# Altium PCB Thunderscope_Rev5.3.PcbDoc (part 2 of 14)
Units mil, origin at the board's own origin, x right, y up, seen from the top; angles counter-clockwise.
Board outline 3937.01 x 3838.58 mil, 6 copper layers (F.Cu, In1.Cu (GND), In2.Cu (Sign), In3.Cu (Sign), In4.Cu (GND), B.Cu), stack 60.556 mil thick; 911 components, 486 nets, 2834 pads, 2761 vias.
Unrouted connection lines stored in the file: 618.
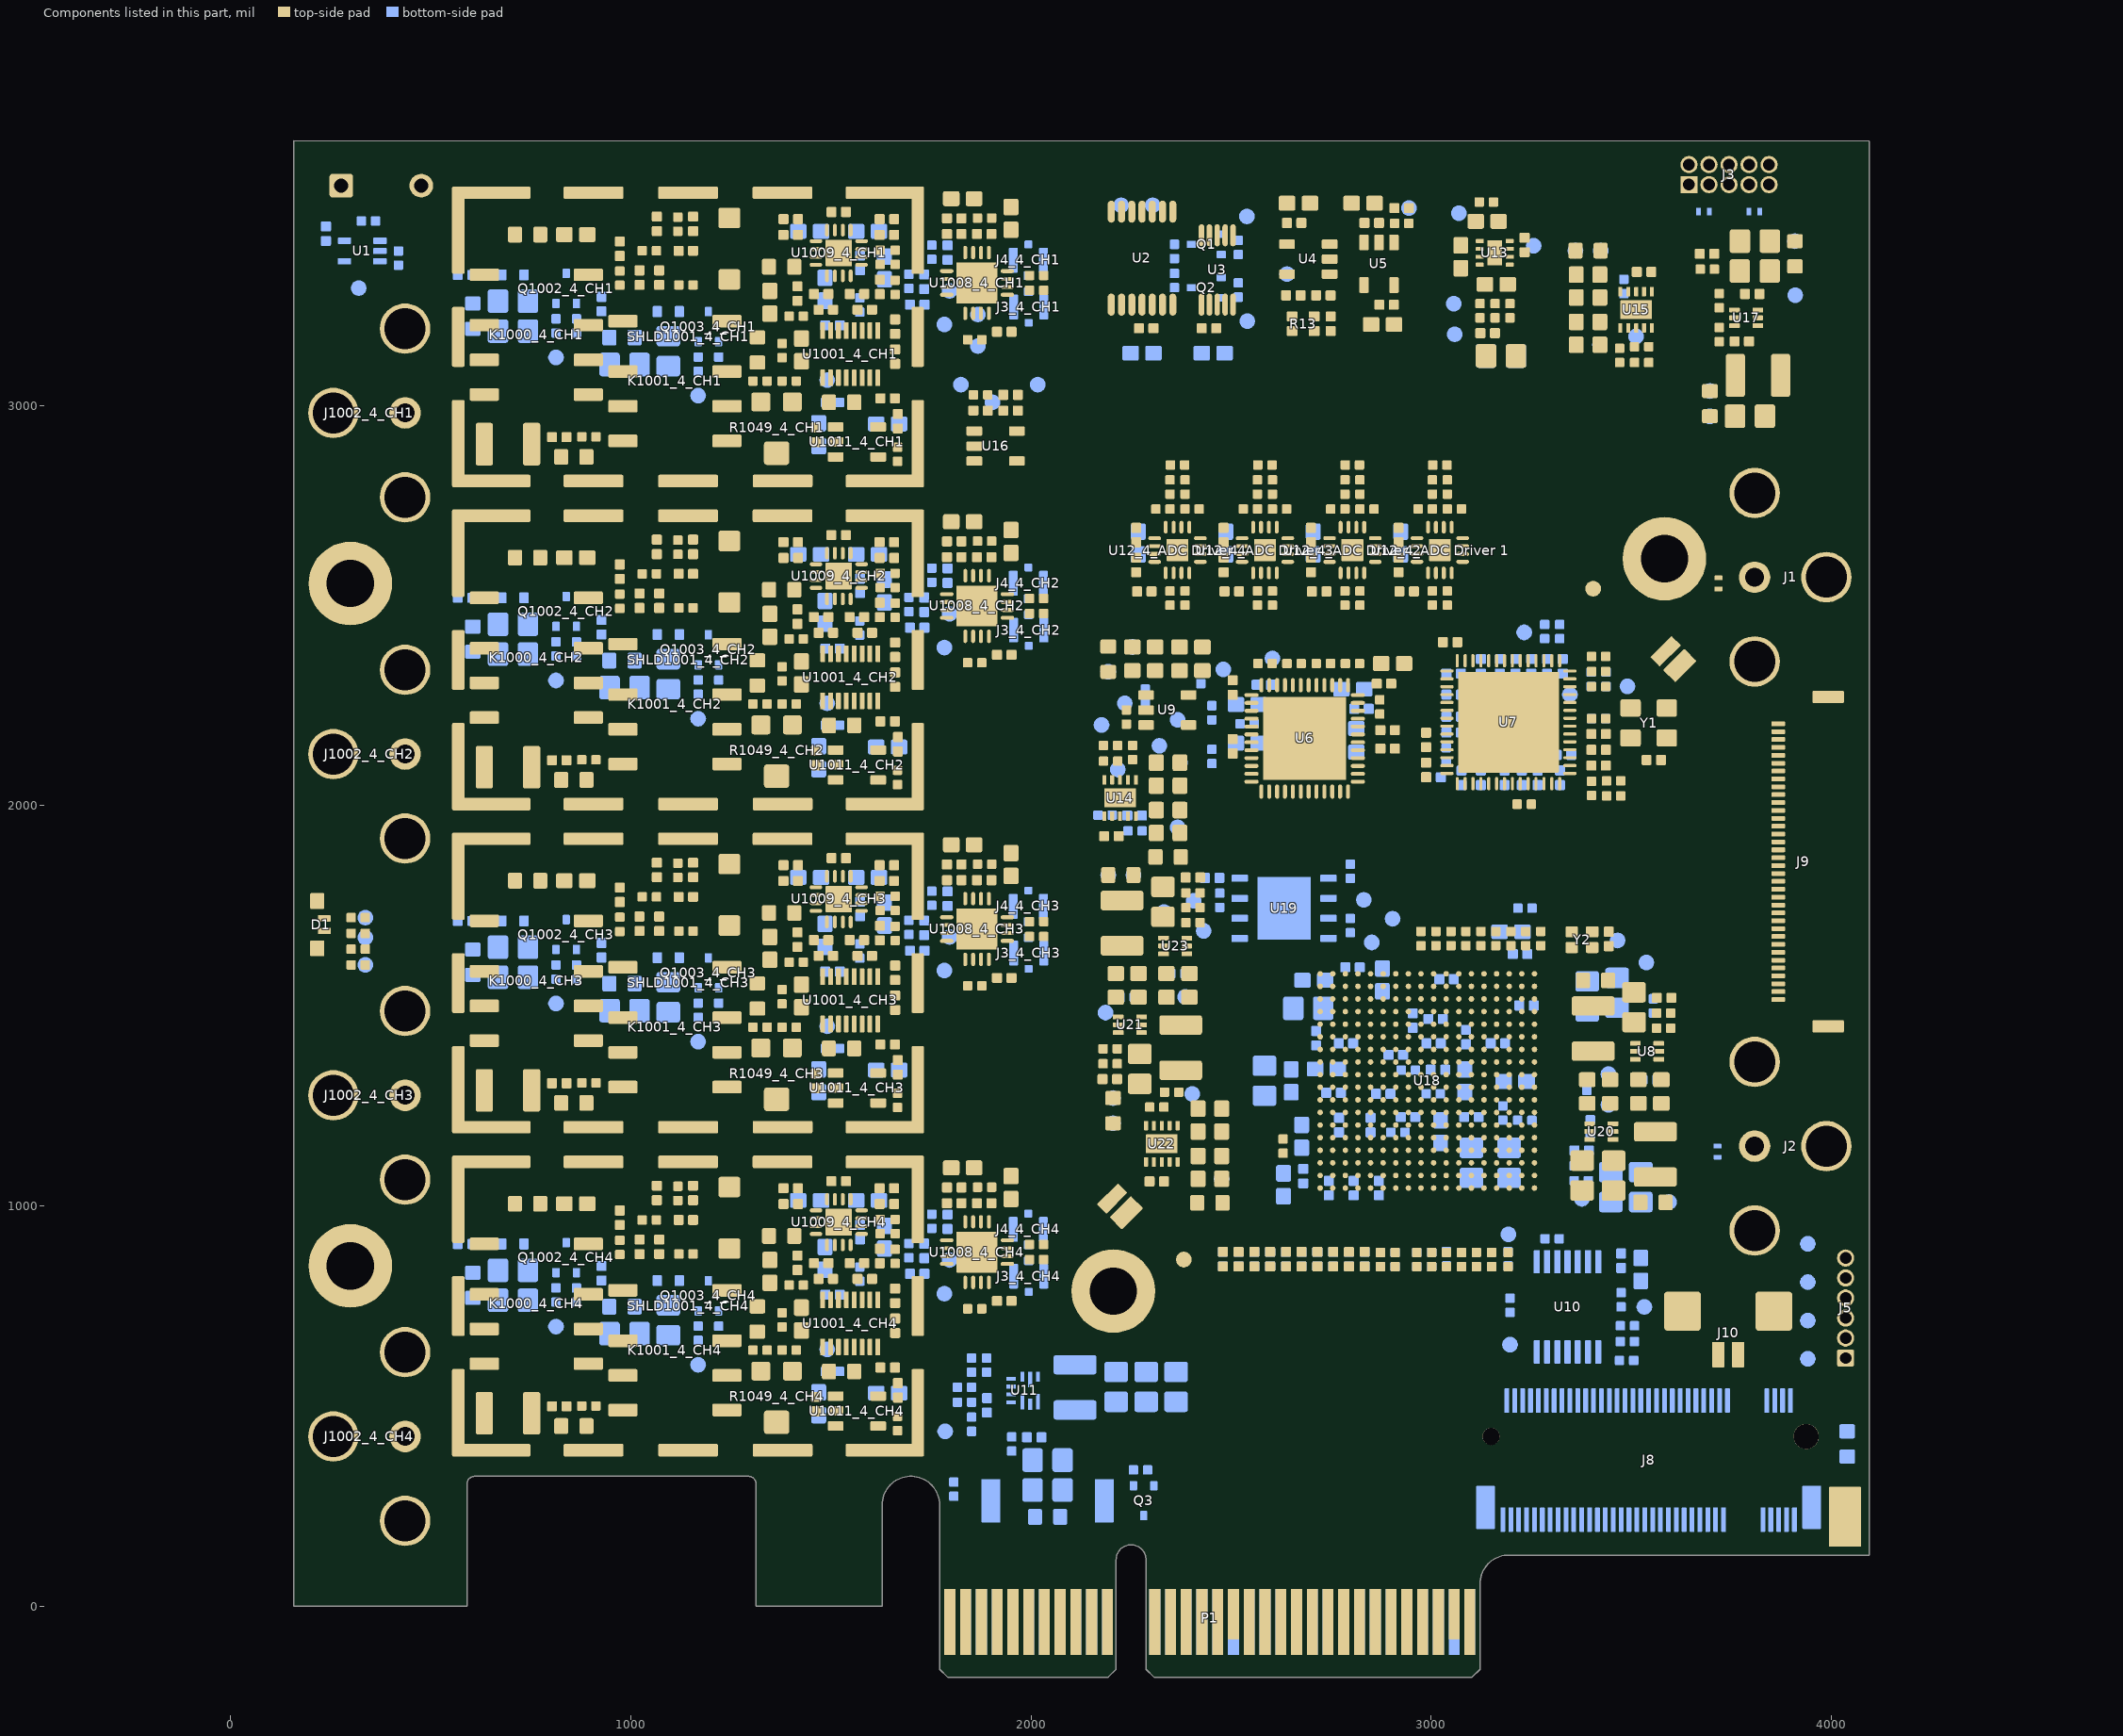
[diagram p6: the components of this part, seen from the top]

## Design rules (kind name [scope] priority, off if disabled: settings) (continued)
SolderMaskExpansion [All] p1: expansion=4 istentingtop=TRUE
ViasUnderSMD [All] p1: allowed=TRUE
Width GND [InNet('GND')] p1: maxlimit=30 minlimit=5 preferedwidth=20
Width Power [InNetClass('Power')] p2: maxlimit=40 minlimit=20 preferedwidth=30
Width 3V3 [InNetClass('3V3')] p3: maxlimit=30 minlimit=10 preferedwidth=20
Width 50Z [InNetClass('50Z')] p4: maxlimit=10 minlimit=5 preferedwidth=6.13 toplayer_minwidth=5.9 toplayer_maxwidth=6.1 toplayer_prefwidth=5.9 midlayer2_minwidth=6.13 midlayer2_maxwidth=6.13 midlayer3_minwidth=6.13 midlayer3_maxwidth=6.13 bottomlayer_minwidth=8.37 bottomlayer_maxwidth=8.37 bottomlayer_prefwidth=8.37 minimp=50.000000 maximp=50.000000 favimp=50.000000
Width [All] p5: maxlimit=400 minlimit=5 preferedwidth=10 midlayer3_prefwidth=8 midlayer4_minwidth=6 midlayer4_prefwidth=8 minimp=50.000000 maximp=50.000000 favimp=50.000000
23 further rules are at their usual default settings.

## Classes and differential pairs
net class 50Z: BNC_IN_CH1 BNC_IN_CH2 BNC_IN_CH3 BNC_IN_CH4
differential pair class USERIO: USERIO.USRIO_1 USERIO.USRIO_2 USERIO.USRIO_3 USERIO.USRIO_4 USERIO.USRIO_5 USERIO.USRIO_6 USERIO.USRIO_7 USERIO.USRIO_8 USERIO.USRIO_9 USERIO.USRIO_10 USERIO.USRIO_11 USERIO.USRIO_12
differential pair class PCIe: M2_PER0 M2_PER1 M2_PER2 M2_PER3 M2_PET0 M2_PET1 M2_PET2 M2_PET3 M2_REFCLK MGT_CLK1 MGT_RX0 MGT_RX1 MGT_RX2 MGT_RX3 MGT_TX0 MGT_TX1 MGT_TX2 MGT_TX3 PCIe_PER0 PCIe_PER1 PCIe_PER2 PCIe_PER3 PCIe_PET0 PCIe_PET1 PCIe_PET2 PCIe_PET3 PCIe_REFCLK
differential pair class 100Z_Diff: D1A D1B D2A D2B D3A D3B D4A D4B FCLK LCLK
differential pair class 100Z_Diff_PGA: CH1 CH2 CH3 CH4
channel class FE_Channel: CH1 CH2 CH3 CH4
channel class ADC_Driver: "ADC Driver 1" "ADC Driver 2" "ADC Driver 3" "ADC Driver 4"
net class TRIM_[4..1]: TRIM_1 TRIM_2 TRIM_3 TRIM_4
net class TERM_[4..1]: TERM_1 TERM_2 TERM_3 TERM_4
net class QSPI_DQ[3..0]: QSPI_DQ0 QSPI_DQ1 QSPI_DQ2 QSPI_DQ3
net class PGA_CSn_[4..1]: PGA_CSn_1 PGA_CSn_2 PGA_CSn_3 PGA_CSn_4
net class DC_CPL_[4..1]: DC_CPL_1 DC_CPL_2 DC_CPL_3 DC_CPL_4
net class ATTEN_[4..1]: ATTEN_1 ATTEN_2 ATTEN_3 ATTEN_4
component class "TS-USB4 Components": C30 C31 C34 C35 C38 C39 C42 C43 C46 C47 C99 C100 C101 C102 C127 C128 D2 D3 J1 J2 J8 J10 L1 R2 R4 R14 R24 R27 R28 R31 R32 R35 R36 R39 R40 R54 R72 R82 R109 R110 SO1 SO2 SO3 SO4 TP21 TP22 U17
component class "TS-PCIe Components": C12 C13 C22 C28 C29 C32 C33 C36 C37 C40 C41 C44 C45 C80 C81 C83 C84 D4 D5 J3 J4 L6 P1 Q3 R3 R5 R7 R23 R25 R26 R29 R30 R33 R34 R37 R38 R41 R42 R71 R73 R74 R81 R87 R88 R92 R95 R108 SHLD1 SYM1 TP14 TP15 TP71 TP72 TP86 U11
component class Thunderscope_Rev5.3: EMI1 EMI2 FID1 FID2 TP2
component class "Front End Trim and Bias": C2 C3 C4 C5 C6 C7 C8 C11 C82 C85 C93 C94 C95 C96 Q1 Q2 R9 R10 R11 R12 R13 R107 TP6 TP7 TP8 TP9 TP59 TP60 U2 U3 U4 U5
component class "FPGA Voltage Regs": C9 C10 C71 C72 C73 C74 C75 C174 C175 C176 C177 C178 C179 C180 C181 C182 C183 C184 C185 C186 C187 C188 L2 L3 L4 L5 R1 R55 R56 R57 R69 R70 R116 R117 R118 R119 R120 R121 R122 R123 R124 R125 R126 R127 R128 R129 R130 TP49 TP50 TP63 TP64 TP65 TP66 TP67 TP68 TP69 TP70 TP79 TP80 TP81 U8 U20 U21 U22 U23
component class FPGA: C1 C78 C79 C130 D1 J5 J9 R6 R8 R60 R61 R62 R63 R64 R65 R85 TP13 TP54 TP55 TP56 TP57 TP58 TP61 U1 U10 Y2
component class "FPGA Power Inputs": C86 C87 C138 C139 C140 C141 C142 C143 C144 C145 C146 C147 C148 C149 C150 C151 C152 C153 C154 C155 C156 C157 C158 C159 C160 C161 C162 C163 C164 C165 C166 C167 C168 C169 C170 C171 C172 C173 C189 C190 C191 FB12 FB13
component class "FPGA IO Banks": R58 R59 R75 R76 R77 R78 R79 R80 R112 TP23 TP24 TP25 TP42 U18
component class "FPGA Config and Transceivers": C129 FB11 R66 R67 R68 R113 R114 R115 TP43 TP44 TP46 TP47 TP48 TP52 TP53 TP75 TP76 TP77 TP78 U19
component class "Clock Generator": C48 C49 C50 C51 C52 C53 C54 C55 C56 C57 C58 C59 C60 C61 C62 C63 C64 C65 C66 C67 C68 C88 C89 C90 C91 C92 FB3 R43 R44 R45 R46 R47 R48 R49 R50 R51 R52 R53 TP16 TP17 TP18 U7 Y1
component class CH4: C1001_4_CH4 C1002_4_CH4 C1003_4_CH4 C1004_4_CH4 C1005_4_CH4 C1006_4_CH4 C1007_4_CH4 C1008_4_CH4 C1009_4_CH4 C1010_4_CH4 C1011_4_CH4 C1012_4_CH4 C1021_4_CH4 C1022_4_CH4 C1023_4_CH4 C1024_4_CH4 C1025_4_CH4 C1026_4_CH4 C1027_4_CH4 C1028_4_CH4 C1029_4_CH4 C1030_4_CH4 C1031_4_CH4 C1032_4_CH4 C1033_4_CH4 C1034_4_CH4 C1035_4_CH4 C1036_4_CH4 C1037_4_CH4 C1038_4_CH4 C1039_4_CH4 C1040_4_CH4 C1041_4_CH4 C1042_4_CH4 C1043_4_CH4 C1044_4_CH4 C1045_4_CH4 C1046_4_CH4 C1047_4_CH4 C1048_4_CH4 C1049_4_CH4 C1050_4_CH4 C1052_4_CH4 C1053_4_CH4 C1054_4_CH4 C1055_4_CH4 C1056_4_CH4 C1057_4_CH4 C1058_4_CH4 C1059_4_CH4 D1000_4_CH4 D1001_4_CH4 FB1000_4_CH4 FB1001_4_CH4 J3_4_CH4 J4_4_CH4 J1002_4_CH4 K1000_4_CH4 K1001_4_CH4 Q1002_4_CH4 Q1003_4_CH4 R52_4_CH4 R97_4_CH4 R1001_4_CH4 R1002_4_CH4 R1003_4_CH4 R1021_4_CH4 R1022_4_CH4 R1024_4_CH4 R1025_4_CH4 R1026_4_CH4 R1027_4_CH4 R1028_4_CH4 R1029_4_CH4 R1030_4_CH4 R1031_4_CH4 R1032_4_CH4 R1033_4_CH4 R1035_4_CH4 R1036_4_CH4 R1037_4_CH4 R1038_4_CH4 R1039_4_CH4 R1041_4_CH4 R1042_4_CH4 R1043_4_CH4 R1044_4_CH4 R1045_4_CH4 R1046_4_CH4 R1047_4_CH4 R1048_4_CH4 R1049_4_CH4 R1052_4_CH4 R1053_4_CH4 SHLD1000_4_CH4 SHLD1001_4_CH4 TP1014_4_CH4 TP1015_4_CH4 TP1016_4_CH4 TP1017_4_CH4 TP1018_4_CH4 U1001_4_CH4 U1008_4_CH4 U1009_4_CH4 U1011_4_CH4
component class CH3: C1001_4_CH3 C1002_4_CH3 C1003_4_CH3 C1004_4_CH3 C1005_4_CH3 C1006_4_CH3 C1007_4_CH3 C1008_4_CH3 C1009_4_CH3 C1010_4_CH3 C1011_4_CH3 C1012_4_CH3 C1021_4_CH3 C1022_4_CH3 C1023_4_CH3 C1024_4_CH3 C1025_4_CH3 C1026_4_CH3 C1027_4_CH3 C1028_4_CH3 C1029_4_CH3 C1030_4_CH3 C1031_4_CH3 C1032_4_CH3 C1033_4_CH3 C1034_4_CH3 C1035_4_CH3 C1036_4_CH3 C1037_4_CH3 C1038_4_CH3 C1039_4_CH3 C1040_4_CH3 C1041_4_CH3 C1042_4_CH3 C1043_4_CH3 C1044_4_CH3 C1045_4_CH3 C1046_4_CH3 C1047_4_CH3 C1048_4_CH3 C1049_4_CH3 C1050_4_CH3 C1052_4_CH3 C1053_4_CH3 C1054_4_CH3 C1055_4_CH3 C1056_4_CH3 C1057_4_CH3 C1058_4_CH3 C1059_4_CH3 D1000_4_CH3 D1001_4_CH3 FB1000_4_CH3 FB1001_4_CH3 J3_4_CH3 J4_4_CH3 J1002_4_CH3 K1000_4_CH3 K1001_4_CH3 Q1002_4_CH3 Q1003_4_CH3 R52_4_CH3 R97_4_CH3 R1001_4_CH3 R1002_4_CH3 R1003_4_CH3 R1021_4_CH3 R1022_4_CH3 R1024_4_CH3 R1025_4_CH3 R1026_4_CH3 R1027_4_CH3 R1028_4_CH3 R1029_4_CH3 R1030_4_CH3 R1031_4_CH3 R1032_4_CH3 R1033_4_CH3 R1035_4_CH3 R1036_4_CH3 R1037_4_CH3 R1038_4_CH3 R1039_4_CH3 R1041_4_CH3 R1042_4_CH3 R1043_4_CH3 R1044_4_CH3 R1045_4_CH3 R1046_4_CH3 R1047_4_CH3 R1048_4_CH3 R1049_4_CH3 R1052_4_CH3 R1053_4_CH3 SHLD1000_4_CH3 SHLD1001_4_CH3 TP1014_4_CH3 TP1015_4_CH3 TP1016_4_CH3 TP1017_4_CH3 TP1018_4_CH3 U1001_4_CH3 U1008_4_CH3 U1009_4_CH3 U1011_4_CH3
component class CH2: C1001_4_CH2 C1002_4_CH2 C1003_4_CH2 C1004_4_CH2 C1005_4_CH2 C1006_4_CH2 C1007_4_CH2 C1008_4_CH2 C1009_4_CH2 C1010_4_CH2 C1011_4_CH2 C1012_4_CH2 C1021_4_CH2 C1022_4_CH2 C1023_4_CH2 C1024_4_CH2 C1025_4_CH2 C1026_4_CH2 C1027_4_CH2 C1028_4_CH2 C1029_4_CH2 C1030_4_CH2 C1031_4_CH2 C1032_4_CH2 C1033_4_CH2 C1034_4_CH2 C1035_4_CH2 C1036_4_CH2 C1037_4_CH2 C1038_4_CH2 C1039_4_CH2 C1040_4_CH2 C1041_4_CH2 C1042_4_CH2 C1043_4_CH2 C1044_4_CH2 C1045_4_CH2 C1046_4_CH2 C1047_4_CH2 C1048_4_CH2 C1049_4_CH2 C1050_4_CH2 C1052_4_CH2 C1053_4_CH2 C1054_4_CH2 C1055_4_CH2 C1056_4_CH2 C1057_4_CH2 C1058_4_CH2 C1059_4_CH2 D1000_4_CH2 D1001_4_CH2 FB1000_4_CH2 FB1001_4_CH2 J3_4_CH2 J4_4_CH2 J1002_4_CH2 K1000_4_CH2 K1001_4_CH2 Q1002_4_CH2 Q1003_4_CH2 R52_4_CH2 R97_4_CH2 R1001_4_CH2 R1002_4_CH2 R1003_4_CH2 R1021_4_CH2 R1022_4_CH2 R1024_4_CH2 R1025_4_CH2 R1026_4_CH2 R1027_4_CH2 R1028_4_CH2 R1029_4_CH2 R1030_4_CH2 R1031_4_CH2 R1032_4_CH2 R1033_4_CH2 R1035_4_CH2 R1036_4_CH2 R1037_4_CH2 R1038_4_CH2 R1039_4_CH2 R1041_4_CH2 R1042_4_CH2 R1043_4_CH2 R1044_4_CH2 R1045_4_CH2 R1046_4_CH2 R1047_4_CH2 R1048_4_CH2 R1049_4_CH2 R1052_4_CH2 R1053_4_CH2 SHLD1000_4_CH2 SHLD1001_4_CH2 TP1014_4_CH2 TP1015_4_CH2 TP1016_4_CH2 TP1017_4_CH2 TP1018_4_CH2 U1001_4_CH2 U1008_4_CH2 U1009_4_CH2 U1011_4_CH2
component class CH1: C1001_4_CH1 C1002_4_CH1 C1003_4_CH1 C1004_4_CH1 C1005_4_CH1 C1006_4_CH1 C1007_4_CH1 C1008_4_CH1 C1009_4_CH1 C1010_4_CH1 C1011_4_CH1 C1012_4_CH1 C1021_4_CH1 C1022_4_CH1 C1023_4_CH1 C1024_4_CH1 C1025_4_CH1 C1026_4_CH1 C1027_4_CH1 C1028_4_CH1 C1029_4_CH1 C1030_4_CH1 C1031_4_CH1 C1032_4_CH1 C1033_4_CH1 C1034_4_CH1 C1035_4_CH1 C1036_4_CH1 C1037_4_CH1 C1038_4_CH1 C1039_4_CH1 C1040_4_CH1 C1041_4_CH1 C1042_4_CH1 C1043_4_CH1 C1044_4_CH1 C1045_4_CH1 C1046_4_CH1 C1047_4_CH1 C1048_4_CH1 C1049_4_CH1 C1050_4_CH1 C1052_4_CH1 C1053_4_CH1 C1054_4_CH1 C1055_4_CH1 C1056_4_CH1 C1057_4_CH1 C1058_4_CH1 C1059_4_CH1 D1000_4_CH1 D1001_4_CH1 FB1000_4_CH1 FB1001_4_CH1 J3_4_CH1 J4_4_CH1 J1002_4_CH1 K1000_4_CH1 K1001_4_CH1 Q1002_4_CH1 Q1003_4_CH1 R52_4_CH1 R97_4_CH1 R1001_4_CH1 R1002_4_CH1 R1003_4_CH1 R1021_4_CH1 R1022_4_CH1 R1024_4_CH1 R1025_4_CH1 R1026_4_CH1 R1027_4_CH1 R1028_4_CH1 R1029_4_CH1 R1030_4_CH1 R1031_4_CH1 R1032_4_CH1 R1033_4_CH1 R1035_4_CH1 R1036_4_CH1 R1037_4_CH1 R1038_4_CH1 R1039_4_CH1 R1041_4_CH1 R1042_4_CH1 R1043_4_CH1 R1044_4_CH1 R1045_4_CH1 R1046_4_CH1 R1047_4_CH1 R1048_4_CH1 R1049_4_CH1 R1052_4_CH1 R1053_4_CH1 SHLD1000_4_CH1 SHLD1001_4_CH1 TP1014_4_CH1 TP1015_4_CH1 TP1016_4_CH1 TP1017_4_CH1 TP1018_4_CH1 U1001_4_CH1 U1008_4_CH1 U1009_4_CH1 U1011_4_CH1
component class ADC: C14 C15 C16 C17 C18 C19 C20 C21 C23 C24 C25 C26 C27 FB1 FB2 R15 R16 R17 R18 R19 R20 R21 R22 TP5 TP10 TP11 TP12 U6
component class "ADC Driver 4": "C69_4_ADC Driver 4" "C70_4_ADC Driver 4" "C104_4_ADC Driver 4" "C105_4_ADC Driver 4" "R131_4_ADC Driver 4" "R132_4_ADC Driver 4" "R133_4_ADC Driver 4" "R134_4_ADC Driver 4" "R135_4_ADC Driver 4" "R136_4_ADC Driver 4" "R137_4_ADC Driver 4" "U12_4_ADC Driver 4"
component class "ADC Driver 3": "C69_4_ADC Driver 3" "C70_4_ADC Driver 3" "C104_4_ADC Driver 3" "C105_4_ADC Driver 3" "R131_4_ADC Driver 3" "R132_4_ADC Driver 3" "R133_4_ADC Driver 3" "R134_4_ADC Driver 3" "R135_4_ADC Driver 3" "R136_4_ADC Driver 3" "R137_4_ADC Driver 3" "U12_4_ADC Driver 3"
component class "ADC Driver 2": "C69_4_ADC Driver 2" "C70_4_ADC Driver 2" "C104_4_ADC Driver 2" "C105_4_ADC Driver 2" "R131_4_ADC Driver 2" "R132_4_ADC Driver 2" "R133_4_ADC Driver 2" "R134_4_ADC Driver 2" "R135_4_ADC Driver 2" "R136_4_ADC Driver 2" "R137_4_ADC Driver 2" "U12_4_ADC Driver 2"
component class "ADC Driver 1": "C69_4_ADC Driver 1" "C70_4_ADC Driver 1" "C104_4_ADC Driver 1" "C105_4_ADC Driver 1" "R131_4_ADC Driver 1" "R132_4_ADC Driver 1" "R133_4_ADC Driver 1" "R134_4_ADC Driver 1" "R135_4_ADC Driver 1" "R136_4_ADC Driver 1" "R137_4_ADC Driver 1" "U12_4_ADC Driver 1"
component class "ACQ and FE Voltage Regs": C76 C77 C97 C98 C103 C106 C107 C108 C109 C110 C111 C112 C114 C115 C116 C117 C118 C119 C120 C121 C122 C123 C124 C125 C126 R86 R89 R90 R91 R93 R94 R96 R97 R98 R99 R100 R101 R102 R103 R104 R105 R106 R111 TP1 TP4 TP26 TP27 TP28 TP29 TP30 TP31 TP32 TP33 TP34 TP35 TP37 TP38 TP39 TP40 U9 U13 U14 U15 U16
differential pair USERIO.USRIO_1: +USERIO.USRIO_1_P -USERIO.USRIO_1_N
differential pair USERIO.USRIO_12: +USERIO.USRIO_12_P -USERIO.USRIO_12_N
differential pair USERIO.USRIO_11: +USERIO.USRIO_11_P -USERIO.USRIO_11_N
differential pair USERIO.USRIO_10: +USERIO.USRIO_10_P -USERIO.USRIO_10_N
differential pair USERIO.USRIO_9: +USERIO.USRIO_9_P -USERIO.USRIO_9_N
differential pair USERIO.USRIO_8: +USERIO.USRIO_8_P -USERIO.USRIO_8_N
differential pair USERIO.USRIO_7: +USERIO.USRIO_7_P -USERIO.USRIO_7_N
differential pair USERIO.USRIO_6: +USERIO.USRIO_6_P -USERIO.USRIO_6_N
differential pair USERIO.USRIO_5: +USERIO.USRIO_5_P -USERIO.USRIO_5_N
differential pair USERIO.USRIO_4: +USERIO.USRIO_4_P -USERIO.USRIO_4_N
differential pair USERIO.USRIO_3: +USERIO.USRIO_3_P -USERIO.USRIO_3_N
differential pair USERIO.USRIO_2: +USERIO.USRIO_2_P -USERIO.USRIO_2_N
differential pair LCLK: +LCLK_P -LCLK_N
differential pair FCLK: +FCLK_P -FCLK_N
differential pair D4B: +D4B_P -D4B_N
differential pair D4A: +D4A_P -D4A_N
differential pair D3B: +D3B_P -D3B_N
differential pair D3A: +D3A_P -D3A_N
differential pair D2B: +D2B_P -D2B_N
differential pair D2A: +D2A_P -D2A_N
differential pair D1B: +D1B_P -D1B_N
differential pair D1A: +D1A_P -D1A_N
differential pair SYNC_OUT: +SYNC_OUT_P -SYNC_OUT_N
differential pair SYNC_IN: +SYNC_IN_P -SYNC_IN_N
differential pair MGT_CLK1: +MGT_CLK1_P -MGT_CLK1_N
differential pair M2_REFCLK: +M2_REFCLK_P -M2_REFCLK_N
differential pair M2_PET3: +M2_PET3_P -M2_PET3_N
differential pair M2_PET2: +M2_PET2_P -M2_PET2_N
differential pair M2_PET1: +M2_PET1_P -M2_PET1_N
differential pair M2_PET0: +M2_PET0_P -M2_PET0_N
differential pair M2_PER3: +M2_PER3_P -M2_PER3_N
differential pair M2_PER2: +M2_PER2_P -M2_PER2_N
differential pair M2_PER1: +M2_PER1_P -M2_PER1_N
differential pair M2_PER0: +M2_PER0_P -M2_PER0_N
differential pair PCIe_REFCLK: +PCIe_REFCLK_P -PCIe_REFCLK_N
differential pair PCIe_PET3: +PCIe_PET3_P -PCIe_PET3_N
differential pair PCIe_PET2: +PCIe_PET2_P -PCIe_PET2_N
differential pair PCIe_PET1: +PCIe_PET1_P -PCIe_PET1_N
differential pair PCIe_PET0: +PCIe_PET0_P -PCIe_PET0_N
differential pair PCIe_PER3: +PCIe_PER3_P -PCIe_PER3_N
differential pair PCIe_PER2: +PCIe_PER2_P -PCIe_PER2_N
differential pair PCIe_PER1: +PCIe_PER1_P -PCIe_PER1_N
differential pair PCIe_PER0: +PCIe_PER0_P -PCIe_PER0_N
differential pair CH4: +CH4_P -CH4_N
differential pair CH3: +CH3_P -CH3_N
differential pair CH2: +CH2_P -CH2_N
differential pair CH1: +CH1_P -CH1_N
differential pair MGT_TX3: +MGT_TX3_P -MGT_TX3_N
differential pair MGT_TX2: +MGT_TX2_P -MGT_TX2_N
differential pair MGT_TX1: +MGT_TX1_P -MGT_TX1_N
differential pair MGT_TX0: +MGT_TX0_P -MGT_TX0_N
differential pair MGT_RX3: +MGT_RX3_P -MGT_RX3_N
differential pair MGT_RX2: +MGT_RX2_P -MGT_RX2_N
differential pair MGT_RX1: +MGT_RX1_P -MGT_RX1_N
differential pair MGT_RX0: +MGT_RX0_P -MGT_RX0_N
differential pair IN4: +IN4_P -IN4_N
differential pair IN3: +IN3_P -IN3_N
differential pair IN2: +IN2_P -IN2_N
differential pair IN1: +IN1_P -IN1_N
differential pair ADC_CLK: +ADC_CLK_P -ADC_CLK_N

## Components (designator, comment, footprint, x,y, rotation, side; value= is the part's Value field where it differs from the comment)
C1 "1uF" GEN_C_0402 238.19,3429.13 r270 bottom
C2 "1uF" GEN_C_0402 2287.8,3192.91 r0 top
C3 "1uF" GEN_C_0402 2444.69,3192.91 r180 top
C4 "100pF" GEN_C_0402 2748.82,3204.13 r270 top
C5 "1uF" GEN_C_0402 2657.48,3456.1 r180 top
C6 "1uF" GEN_C_0402 2655.51,3275 r180 top
C7 "1uF" GEN_C_0402 2730.31,3275 r0 top
C8 "1uF" GEN_C_0402 2888.48,3251.57 r0 top
C9 "10uF" GEN_C_0603 3418.31,1256.35 r180 top
C10 "10uF" GEN_C_0603 2367.13,1521.65 r0 top
C11 "1uF" GEN_C_0402 2851.28,3456.1 r180 top
C12 "22uF" GEN_C_0805 2041.34,365.16 r0 bottom
C13 "100nF" GEN_C_0402 1889.76,501.97 r270 bottom
C14 "10uF" GEN_C_0603 2903.54,2355.32 r0 top
C15 "10uF" GEN_C_0603 2540.35,2252.95 r0 bottom
C16 "1uF" GEN_C_0402 2881.89,2305.12 r180 top
C17 "1uF" GEN_C_0402 2503.94,2295.28 r270 top
C18 "1uF" GEN_C_0402 2503.94,2148.62 r90 top
C19 "1uF" GEN_C_0402 2891.03,2142.72 r180 top
C20 "10uF" GEN_C_0603 2784.45,2133.86 r180 bottom
C21 "10uF" GEN_C_0603 2540.35,2156.54 r0 bottom
C22 "22uF" GEN_C_0805 2212.77,548.23 r90 bottom
C23 "10uF" GEN_C_0603 2784.45,2192.91 r180 bottom
C24 "1uF" GEN_C_0402 2891.03,2188.98 r180 top
C25 "1uF" GEN_C_0402 2825.79,2242.13 r0 bottom
C26 "10uF" GEN_C_0603 2804.13,2291.34 r180 bottom
C27 "100nF" GEN_C_0402 2581.69,2302.17 r0 bottom
C28 "220nF" GEN_C_0402 2833.66,867.13 r270 bottom
C29 "220nF" GEN_C_0402 2794.29,867.13 r270 bottom
C30 "220nF" GEN_C_0402 2833.66,867.13 r270 top
C31 "220nF" GEN_C_0402 2794.29,867.13 r270 top
C32 "220nF" GEN_C_0402 2754.92,867.13 r270 bottom
C33 "220nF" GEN_C_0402 2715.55,867.13 r270 bottom
C34 "220nF" GEN_C_0402 2754.92,867.13 r270 top
C35 "220nF" GEN_C_0402 2715.55,867.13 r270 top
C36 "220nF" GEN_C_0402 2676.18,867.13 r270 bottom
C37 "220nF" GEN_C_0402 2636.81,867.13 r270 bottom
C38 "220nF" GEN_C_0402 2676.18,867.13 r270 top
C39 "220nF" GEN_C_0402 2636.81,867.13 r270 top
C40 "220nF" GEN_C_0402 2597.44,867.13 r270 bottom
C41 "220nF" GEN_C_0402 2558.07,867.13 r270 bottom
C42 "220nF" GEN_C_0402 2597.44,867.13 r270 top
C43 "220nF" GEN_C_0402 2558.07,867.13 r270 top
C44 "100nF" GEN_C_0402 2518.7,867.13 r270 bottom
C45 "100nF" GEN_C_0402 2479.33,867.13 r270 bottom
C46 "100nF" GEN_C_0402 2518.7,867.13 r270 top
C47 "100nF" GEN_C_0402 2479.33,867.13 r270 top
C48 "1uF" GEN_C_0402 3265.75,2069.88 r270 bottom
C49 "1uF" GEN_C_0402 3331.69,2126.97 r0 bottom
C50 "1uF" GEN_C_0402 3250,2348.43 r90 bottom
C51 "1uF" GEN_C_0402 3047.24,2408.46 r0 top
C52 "1uF" GEN_C_0402 3056.1,2330.32 r180 bottom
C53 "1uF" GEN_C_0402 3183.07,2069.88 r270 bottom
C54 "1uF" GEN_C_0402 3075.79,2069.88 r270 bottom
C55 "1uF" GEN_C_0402 3124.02,2069.88 r270 bottom
C56 "1uF" GEN_C_0402 3226.38,2069.88 r270 bottom
C57 "1uF" GEN_C_0402 3321.85,2069.88 r270 bottom
C58 "1uF" GEN_C_0402 3289.37,2348.43 r90 bottom
C59 "1uF" GEN_C_0402 3210.63,2348.43 r90 bottom
C60 "1uF" GEN_C_0402 3124.02,2348.43 r90 bottom
C61 "1uF" GEN_C_0402 3056.1,2222.44 r180 bottom
C62 "1uF" GEN_C_0402 2987.2,2164.37 r90 top
C63 "1uF" GEN_C_0402 3056.1,2183.07 r180 bottom
C64 "0" GEN_R_0402 3400.59,2043.31 r270 top
C65 "100nF" GEN_C_0402 3418.31,2100.39 r0 top
C66 "100nF" GEN_C_0402 3418.31,2139.76 r180 top
C67 "100nF" GEN_C_0402 3418.31,2179.13 r180 top
C68 "1uF" GEN_C_0402 3556.1,2114.17 r0 top
"C69_4_ADC Driver 1" "10uF" GEN_C_0603 2923.63,2656.3 r90 bottom (schematic designator C69_4)
"C69_4_ADC Driver 2" "10uF" GEN_C_0603 2705.12,2656.3 r90 bottom (schematic designator C69_4)
"C69_4_ADC Driver 3" "10uF" GEN_C_0603 2486.62,2656.3 r90 bottom (schematic designator C69_4)
"C69_4_ADC Driver 4" "10uF" GEN_C_0603 2268.11,2656.3 r90 bottom (schematic designator C69_4)
"C70_4_ADC Driver 1" "1uF" GEN_C_0402 2918.18,2601.38 r90 top (schematic designator C70_4)
"C70_4_ADC Driver 2" "1uF" GEN_C_0402 2699.67,2601.38 r90 top (schematic designator C70_4)
"C70_4_ADC Driver 3" "1uF" GEN_C_0402 2481.17,2601.38 r90 top (schematic designator C70_4)
"C70_4_ADC Driver 4" "1uF" GEN_C_0402 2262.66,2601.38 r90 top (schematic designator C70_4)
C71 "10uF" GEN_C_0603 2240.16,1580.71 r180 top
C72 "10uF" GEN_C_0603 3546.26,1256.35 r0 top
C73 "10uF" GEN_C_0603 3546.26,1315.4 r0 top
C74 "100pF" GEN_C_0402 3581.69,1520.13 r0 top
C75 "22uF" GEN_C_0805 3506.89,1496.51 r270 top
C76 "1uF" GEN_C_0402 1948.82,3026.57 r0 top
C77 "100nF" GEN_C_0402 2258.86,1975.39 r0 bottom
C78 "1uF" GEN_C_0402 3474.41,863.19 r90 bottom
C79 "10uF" GEN_C_0603 3523.62,841.54 r270 bottom
C80 "22uF" GEN_C_0805 2041.34,290.35 r0 bottom
C81 "100nF" GEN_C_0402 2007.87,422.24 r0 bottom
C82 "100nF" GEN_C_0402 2926.08,3493.11 r180 top
C83 "22uF" GEN_C_0805 2287.57,548.23 r90 bottom
C84 "22uF" GEN_C_0805 2362.38,548.23 r90 bottom
C85 "10uF" GEN_C_0603 2878.25,3202.36 r180 top
C86 "47uF" GEN_C_0805 3448.82,1047.24 r90 bottom
C87 "47uF" GEN_C_0805 3194.94,1107.64 r270 bottom
C88 "1uF" GEN_C_0402 3056.1,2277.56 r180 bottom
C89 "1uF" GEN_C_0402 3328.74,2348.43 r90 bottom
C90 "1uF" GEN_C_0402 3171.26,2348.43 r90 bottom
C91 "1uF" GEN_C_0402 2987.2,2089.57 r90 top
C92 "1uF" GEN_C_0402 3005.91,2070.87 r0 bottom
C93 "10uF" GEN_C_0603 2829.63,3505.32 r0 top
C94 "10uF" GEN_C_0603 2668.31,3505.32 r0 top
C95 "10uF" GEN_C_0603 2455.12,3130.71 r0 bottom
C96 "10uF" GEN_C_0603 2277.36,3130.71 r180 bottom
C97 "22uF" GEN_C_0805 3174.41,3123.62 r0 top
C98 "22uF" GEN_C_0805 3174.41,3123.62 r0 bottom
C99 "22uF" GEN_C_0805 3796.46,2973.03 r0 top
C100 "18pF" GEN_C_0402 3688.98,3378.94 r180 top
C101 "22uF" GEN_C_0805 3808.66,3410.43 r180 top
C102 "1uF" GEN_C_0402 3802.17,3278.54 r0 top
C103 "1uF" GEN_C_0402 3140.94,3180.71 r180 top
"C104_4_ADC Driver 1" "1uF" GEN_C_0402 2938.59,2535.43 r0 top (schematic designator C104_4)
"C104_4_ADC Driver 2" "1uF" GEN_C_0402 2720.08,2535.43 r0 top (schematic designator C104_4)
"C104_4_ADC Driver 3" "1uF" GEN_C_0402 2501.58,2535.43 r0 top (schematic designator C104_4)
"C104_4_ADC Driver 4" "1uF" GEN_C_0402 2283.07,2535.43 r0 top (schematic designator C104_4)
"C105_4_ADC Driver 1" "1uF" GEN_C_0402 2918.18,2676.18 r270 top (schematic designator C105_4)
"C105_4_ADC Driver 2" "1uF" GEN_C_0402 2699.67,2676.18 r270 top (schematic designator C105_4)
"C105_4_ADC Driver 3" "1uF" GEN_C_0402 2481.17,2676.18 r270 top (schematic designator C105_4)
"C105_4_ADC Driver 4" "1uF" GEN_C_0402 2262.66,2676.18 r270 top (schematic designator C105_4)
C106 "10uF" GEN_C_0603 3162.6,3302.56 r0 top
C107 "10uF" GEN_C_0603 2281.5,2337.6 r0 top
C108 "10uF" GEN_C_0603 2281.5,2396.65 r0 top
C109 "10uF" GEN_C_0603 2399.61,2337.6 r180 top
C110 "10uF" GEN_C_0603 2399.61,2396.65 r180 top
C111 "10uF" GEN_C_0603 3139.76,3460.04 r0 top
C112 "1uF" GEN_C_0402 3233.27,3400.98 r90 top
C114 "10uF" GEN_C_0603 3073.82,3371.46 r90 top
C115 "10uF" GEN_C_0603 2372.05,1960.63 r90 top
C116 "10uF" GEN_C_0603 2312.99,1960.63 r90 top
C117 "10uF" GEN_C_0603 2312.99,2078.74 r270 top
C118 "10uF" GEN_C_0603 2372.05,2078.74 r270 top
C119 "10uF" GEN_C_0603 3362.4,3298.23 r270 top
C120 "10uF" GEN_C_0603 3421.46,3298.23 r270 top
C121 "10uF" GEN_C_0603 3421.46,3180.12 r90 top
C122 "10uF" GEN_C_0603 3362.4,3180.12 r90 top
C123 "100nF" GEN_C_0402 2200.79,1924.21 r180 top
C124 "100nF" GEN_C_0402 3531.69,3333.66 r0 top
C125 "1uF" GEN_C_0402 1874.02,2987.2 r180 top
C126 "1uF" GEN_C_0402 1948.82,2987.2 r0 top
C127 "1uF" GEN_C_0402 3775.79,3160.04 r180 top
C128 "22uF" GEN_C_0805 3808.46,3335.63 r180 top
C129 "100nF" GEN_C_0402 2452.76,1819.69 r180 bottom
C130 "1uF" GEN_C_0402 3443.67,1667.32 r270 top
C138 "1uF" GEN_C_0402 3038.44,1566.79 r0 bottom
C139 "1uF" GEN_C_0402 3221.92,1629.4 r180 bottom
C140 "1uF" GEN_C_0402 3166.59,1406.36 r180 bottom
C141 "1uF" GEN_C_0402 3238.24,1500.85 r0 bottom
C142 "10uF" GEN_C_0603 3199.31,1685.04 r0 bottom
C143 "10uF" GEN_C_0603 3209.5,1311.28 r0 bottom
C144 "47uF" GEN_C_0805 3389.76,1523.62 r270 bottom
C145 "47uF" GEN_C_0805 2692.58,1493.96 r180 bottom
C146 "10uF" GEN_C_0603 2878.01,1564.83 r270 bottom
C147 "10uF" GEN_C_0603 2706.75,1563.84 r180 bottom
C148 "1uF" GEN_C_0402 2712.65,1419.16 r90 bottom
C149 "1uF" GEN_C_0402 2803.21,1596.32 r0 bottom
C150 "1uF" GEN_C_0402 2755.96,1282.94 r0 bottom
C151 "1uF" GEN_C_0402 2953.6,1463.25 r90 bottom
C152 "47uF" GEN_C_0805 3464.57,1532.48 r270 bottom
C153 "47uF" GEN_C_0805 3100.45,1107.64 r270 bottom
C154 "1uF" GEN_C_0402 2879.98,1280.38 r0 bottom
C155 "1uF" GEN_C_0402 2941.99,1222.31 r0 bottom
C156 "1uF" GEN_C_0402 3005.96,1406.36 r0 bottom
C157 "1uF" GEN_C_0402 3100.45,1222.31 r180 bottom
C158 "10uF" GEN_C_0603 3083.72,1312.86 r270 bottom
C159 "10uF" GEN_C_0603 3023.28,1185.69 r270 bottom
C160 "47uF" GEN_C_0805 3523.62,1047.24 r90 bottom
C161 "47uF" GEN_C_0805 2583.13,1312.86 r90 bottom
C162 "10uF" GEN_C_0603 2650.06,1312.86 r90 bottom
C163 "10uF" GEN_C_0603 2738.24,1342.38 r180 bottom
C164 "1uF" GEN_C_0402 3086.67,1422.11 r90 bottom
C165 "1uF" GEN_C_0402 2911.47,1377.82 r0 bottom
C166 "1uF" GEN_C_0402 3010.88,1467.38 r0 bottom
C167 "1uF" GEN_C_0402 3016.79,1340.42 r180 bottom
C168 "10uF" GEN_C_0603 2630.96,1053.01 r270 bottom
C169 "100nF" GEN_C_0402 2744.15,1044.65 r90 bottom
C170 "100nF" GEN_C_0402 2806.16,1044.65 r90 bottom
C171 "100nF" GEN_C_0402 2848.48,1202.13 r90 bottom
C172 "100nF" GEN_C_0402 2769.74,1202.13 r90 bottom
C173 "10uF" GEN_C_0603 2676.24,1174.08 r90 bottom
C174 "100pF" GEN_C_0402 3375.98,1138.78 r0 bottom
C175 "10uF" GEN_C_0603 3418.31,1315.4 r180 top
C176 "22uF" GEN_C_0805 3455.71,1075.79 r90 top
C177 "22uF" GEN_C_0805 3376.97,1075.79 r90 top
C178 "100pF" GEN_C_0402 2196.85,1316.93 r180 top
C179 "10uF" GEN_C_0603 2240.16,1521.65 r180 top
C180 "22uF" GEN_C_0805 2271.65,1342.52 r90 top
C181 "10uF" GEN_C_0603 2476.38,1096.46 r90 top
C182 "10uF" GEN_C_0603 2417.32,1096.46 r90 top
C183 "10uF" GEN_C_0603 2417.32,1214.57 r270 top
C184 "10uF" GEN_C_0603 2476.38,1214.57 r270 top
C185 "100nF" GEN_C_0402 2314.17,1061.42 r180 top
C186 "100pF" GEN_C_0402 2404.53,1820.87 r0 top
C187 "10uF" GEN_C_0603 2367.13,1580.71 r0 top
C188 "22uF" GEN_C_0805 2329.72,1759.84 r270 top
C189 "100nF" GEN_C_0402 2869.15,1044.65 r270 bottom
C190 "100nF" GEN_C_0402 2680.17,1074.67 r270 bottom
C191 "1uF" GEN_C_0402 2786.87,1406.36 r0 bottom
C1001_4_CH1 "100pF" GEN_C_0402 1584.65,3239.17 r180 top (schematic designator C1001_4)
C1001_4_CH2 "100pF" GEN_C_0402 1584.65,2432.09 r180 top (schematic designator C1001_4)
C1001_4_CH3 "100pF" GEN_C_0402 1584.65,1625 r180 top (schematic designator C1001_4)
C1001_4_CH4 "100pF" GEN_C_0402 1584.65,817.91 r180 top (schematic designator C1001_4)
C1002_4_CH1 "68pF" GEN_C_0402 1660.43,3196.85 r270 top (schematic designator C1002_4)
C1002_4_CH2 "68pF" GEN_C_0402 1660.43,2389.76 r270 top (schematic designator C1002_4)
C1002_4_CH3 "68pF" GEN_C_0402 1660.43,1582.68 r270 top (schematic designator C1002_4)
C1002_4_CH4 "68pF" GEN_C_0402 1660.43,775.59 r270 top (schematic designator C1002_4)
C1003_4_CH1 "10uF" GEN_C_0603 1485.24,3290.35 r270 bottom (schematic designator C1003_4)
C1003_4_CH2 "10uF" GEN_C_0603 1485.24,2483.27 r270 bottom (schematic designator C1003_4)
C1003_4_CH3 "10uF" GEN_C_0603 1485.24,1676.18 r270 bottom (schematic designator C1003_4)
C1003_4_CH4 "10uF" GEN_C_0603 1485.24,869.09 r270 bottom (schematic designator C1003_4)
C1004_4_CH1 "10uF" GEN_C_0603 1641.73,2953.74 r0 bottom (schematic designator C1004_4)
C1004_4_CH2 "10uF" GEN_C_0603 1641.73,2146.65 r0 bottom (schematic designator C1004_4)
C1004_4_CH3 "10uF" GEN_C_0603 1641.73,1339.57 r0 bottom (schematic designator C1004_4)
C1004_4_CH4 "10uF" GEN_C_0603 1641.73,532.48 r0 bottom (schematic designator C1004_4)
C1005_4_CH1 "10uF" GEN_C_0603 1633.86,3343.5 r90 bottom (schematic designator C1005_4)
C1005_4_CH2 "10uF" GEN_C_0603 1633.86,2536.42 r90 bottom (schematic designator C1005_4)
C1005_4_CH3 "10uF" GEN_C_0603 1633.86,1729.33 r90 bottom (schematic designator C1005_4)
C1005_4_CH4 "10uF" GEN_C_0603 1633.86,922.24 r90 bottom (schematic designator C1005_4)
C1006_4_CH1 "10uF" GEN_C_0603 1591.54,3435.04 r180 bottom (schematic designator C1006_4)
C1006_4_CH2 "10uF" GEN_C_0603 1591.54,2627.95 r180 bottom (schematic designator C1006_4)
C1006_4_CH3 "10uF" GEN_C_0603 1591.54,1820.87 r180 bottom (schematic designator C1006_4)
C1006_4_CH4 "10uF" GEN_C_0603 1591.54,1013.78 r180 bottom (schematic designator C1006_4)
C1007_4_CH1 "10uF" GEN_C_0603 1469.49,2927.17 r270 bottom (schematic designator C1007_4)
C1007_4_CH2 "10uF" GEN_C_0603 1469.49,2120.08 r270 bottom (schematic designator C1007_4)
C1007_4_CH3 "10uF" GEN_C_0603 1469.49,1312.99 r270 bottom (schematic designator C1007_4)
C1007_4_CH4 "10uF" GEN_C_0603 1469.49,505.91 r270 bottom (schematic designator C1007_4)
C1008_4_CH1 "10uF" GEN_C_0603 1446.85,3435.04 r0 bottom (schematic designator C1008_4)
C1008_4_CH2 "10uF" GEN_C_0603 1446.85,2627.95 r0 bottom (schematic designator C1008_4)
C1008_4_CH3 "10uF" GEN_C_0603 1446.85,1820.87 r0 bottom (schematic designator C1008_4)
C1008_4_CH4 "10uF" GEN_C_0603 1446.85,1013.78 r0 bottom (schematic designator C1008_4)
C1009_4_CH1 "1uF" GEN_C_0402 585.53,3326.38 r0 bottom (schematic designator C1009_4)
C1009_4_CH2 "1uF" GEN_C_0402 585.53,2519.29 r0 bottom (schematic designator C1009_4)
C1009_4_CH3 "1uF" GEN_C_0402 585.53,1712.2 r0 bottom (schematic designator C1009_4)
C1009_4_CH4 "1uF" GEN_C_0402 585.53,905.12 r0 bottom (schematic designator C1009_4)
C1010_4_CH1 "1uF" GEN_C_0402 926.77,3253.15 r270 bottom (schematic designator C1010_4)
C1010_4_CH2 "1uF" GEN_C_0402 926.77,2446.06 r270 bottom (schematic designator C1010_4)
C1010_4_CH3 "1uF" GEN_C_0402 926.77,1638.98 r270 bottom (schematic designator C1010_4)
C1010_4_CH4 "1uF" GEN_C_0402 926.77,831.89 r270 bottom (schematic designator C1010_4)
C1011_4_CH1 "3pF" GEN_C_0402 972.44,3391.73 r90 top (schematic designator C1011_4)
C1011_4_CH2 "3pF" GEN_C_0402 972.44,2584.65 r90 top (schematic designator C1011_4)
C1011_4_CH3 "3pF" GEN_C_0402 972.44,1777.56 r90 top (schematic designator C1011_4)
C1011_4_CH4 "3pF" GEN_C_0402 972.44,970.47 r90 top (schematic designator C1011_4)
C1012_4_CH1 "0.3pF" GEN_C_0402 1021.65,3319.29 r90 top (schematic designator C1012_4)
C1012_4_CH2 "0.3pF" GEN_C_0402 1021.65,2512.2 r90 top (schematic designator C1012_4)
C1012_4_CH3 "0.3pF" GEN_C_0402 1021.65,1705.12 r90 top (schematic designator C1012_4)
C1012_4_CH4 "0.3pF" GEN_C_0402 1021.65,898.03 r90 top (schematic designator C1012_4)
C1021_4_CH1 "3pF" GEN_C_0402 1155.51,3453.74 r90 top (schematic designator C1021_4)
C1021_4_CH2 "3pF" GEN_C_0402 1155.51,2646.65 r90 top (schematic designator C1021_4)
C1021_4_CH3 "3pF" GEN_C_0402 1155.51,1839.57 r90 top (schematic designator C1021_4)
C1021_4_CH4 "3pF" GEN_C_0402 1155.51,1032.48 r90 top (schematic designator C1021_4)
C1022_4_CH1 "DNP" GEN_C_0603 862.54,3426.89 r0 top (schematic designator C1022_4)
C1022_4_CH2 "DNP" GEN_C_0603 862.54,2619.8 r0 top (schematic designator C1022_4)
C1022_4_CH3 "DNP" GEN_C_0603 862.54,1812.72 r0 top (schematic designator C1022_4)
C1022_4_CH4 "DNP" GEN_C_0603 862.54,1005.65 r0 top (schematic designator C1022_4)
C1023_4_CH1 "3pF" GEN_C_0402 1070.87,3319.29 r90 top (schematic designator C1023_4)
C1023_4_CH2 "3pF" GEN_C_0402 1070.87,2512.2 r90 top (schematic designator C1023_4)
C1023_4_CH3 "3pF" GEN_C_0402 1070.87,1705.12 r90 top (schematic designator C1023_4)
C1023_4_CH4 "3pF" GEN_C_0402 1070.87,898.03 r90 top (schematic designator C1023_4)
C1024_4_CH1 "1pF" GEN_C_0402 1137.4,3386.42 r0 top (schematic designator C1024_4)
C1024_4_CH2 "1pF" GEN_C_0402 1137.4,2579.33 r0 top (schematic designator C1024_4)
C1024_4_CH3 "1pF" GEN_C_0402 1137.4,1772.24 r0 top (schematic designator C1024_4)
C1024_4_CH4 "1pF" GEN_C_0402 1137.4,965.16 r0 top (schematic designator C1024_4)
C1025_4_CH1 "8pF" GEN_C_0402 1064.96,3453.74 r90 top (schematic designator C1025_4)
C1025_4_CH2 "8pF" GEN_C_0402 1064.96,2646.65 r90 top (schematic designator C1025_4)
C1025_4_CH3 "8pF" GEN_C_0402 1064.96,1839.57 r90 top (schematic designator C1025_4)
C1025_4_CH4 "8pF" GEN_C_0402 1064.96,1032.48 r90 top (schematic designator C1025_4)
C1026_4_CH1 "22uF" GEN_C_0805 705.51,3185.83 r0 bottom (schematic designator C1026_4)
C1026_4_CH2 "22uF" GEN_C_0805 705.51,2378.74 r0 bottom (schematic designator C1026_4)
C1026_4_CH3 "22uF" GEN_C_0805 705.51,1571.65 r0 bottom (schematic designator C1026_4)
C1026_4_CH4 "22uF" GEN_C_0805 705.51,764.57 r0 bottom (schematic designator C1026_4)
C1027_4_CH1 "22uF" GEN_C_0805 705.51,3260.63 r0 bottom (schematic designator C1027_4)
C1027_4_CH2 "22uF" GEN_C_0805 705.51,2453.54 r0 bottom (schematic designator C1027_4)
C1027_4_CH3 "22uF" GEN_C_0805 705.51,1646.46 r0 bottom (schematic designator C1027_4)
C1027_4_CH4 "22uF" GEN_C_0805 705.51,839.37 r0 bottom (schematic designator C1027_4)
C1028_4_CH1 "22uF" GEN_C_0805 1093.7,3135.83 r270 bottom (schematic designator C1028_4)
C1028_4_CH2 "22uF" GEN_C_0805 1093.7,2328.74 r270 bottom (schematic designator C1028_4)
C1028_4_CH3 "22uF" GEN_C_0805 1093.7,1521.65 r270 bottom (schematic designator C1028_4)
C1028_4_CH4 "22uF" GEN_C_0805 1093.7,714.57 r270 bottom (schematic designator C1028_4)
C1029_4_CH1 "22uF" GEN_C_0805 984.25,3102.36 r0 bottom (schematic designator C1029_4)
C1029_4_CH2 "22uF" GEN_C_0805 984.25,2295.28 r0 bottom (schematic designator C1029_4)
C1029_4_CH3 "22uF" GEN_C_0805 984.25,1488.19 r0 bottom (schematic designator C1029_4)
C1029_4_CH4 "22uF" GEN_C_0805 984.25,681.1 r0 bottom (schematic designator C1029_4)
C1030_4_CH1 "1nF" GEN_C_0603 1347.44,3257.87 r90 top (schematic designator C1030_4)
C1030_4_CH2 "1nF" GEN_C_0603 1347.44,2450.79 r90 top (schematic designator C1030_4)
C1030_4_CH3 "1nF" GEN_C_0603 1347.44,1643.7 r90 top (schematic designator C1030_4)
C1030_4_CH4 "1nF" GEN_C_0603 1347.44,836.61 r90 top (schematic designator C1030_4)
C1031_4_CH1 "10nF" GEN_C_0603 1426.18,3138.78 r90 top (schematic designator C1031_4)
C1031_4_CH2 "10nF" GEN_C_0603 1426.18,2331.69 r90 top (schematic designator C1031_4)
C1031_4_CH3 "10nF" GEN_C_0603 1426.18,1524.61 r90 top (schematic designator C1031_4)
C1031_4_CH4 "10nF" GEN_C_0603 1426.18,717.52 r90 top (schematic designator C1031_4)
C1032_4_CH1 "100nF" GEN_C_0402 1622.05,3296.26 r90 top (schematic designator C1032_4)
C1032_4_CH2 "100nF" GEN_C_0402 1622.05,2489.17 r90 top (schematic designator C1032_4)
C1032_4_CH3 "100nF" GEN_C_0402 1622.05,1682.09 r90 top (schematic designator C1032_4)
C1032_4_CH4 "100nF" GEN_C_0402 1622.05,875 r90 top (schematic designator C1032_4)
C1033_4_CH1 "100nF" GEN_C_0402 1791.34,3381.89 r270 bottom (schematic designator C1033_4)
C1033_4_CH2 "100nF" GEN_C_0402 1791.34,2574.8 r270 bottom (schematic designator C1033_4)
C1033_4_CH3 "100nF" GEN_C_0402 1791.34,1767.72 r270 bottom (schematic designator C1033_4)
C1033_4_CH4 "100nF" GEN_C_0402 1791.34,960.63 r270 bottom (schematic designator C1033_4)
C1034_4_CH1 "100pF" GEN_C_0402 1416.34,3279.53 r270 top (schematic designator C1034_4)
C1034_4_CH2 "100pF" GEN_C_0402 1416.34,2472.44 r270 top (schematic designator C1034_4)
C1034_4_CH3 "100pF" GEN_C_0402 1416.34,1665.35 r270 top (schematic designator C1034_4)
C1034_4_CH4 "100pF" GEN_C_0402 1416.34,858.27 r270 top (schematic designator C1034_4)
C1035_4_CH1 "100pF" GEN_C_0402 1660.43,3122.05 r90 top (schematic designator C1035_4)
C1035_4_CH2 "100pF" GEN_C_0402 1660.43,2314.96 r90 top (schematic designator C1035_4)
C1035_4_CH3 "100pF" GEN_C_0402 1660.43,1507.87 r90 top (schematic designator C1035_4)
C1035_4_CH4 "100pF" GEN_C_0402 1660.43,700.79 r90 top (schematic designator C1035_4)
C1036_4_CH1 "1uF" GEN_C_0402 1808.07,3428.15 r0 top (schematic designator C1036_4)
C1036_4_CH2 "1uF" GEN_C_0402 1808.07,2621.06 r0 top (schematic designator C1036_4)
C1036_4_CH3 "1uF" GEN_C_0402 1808.07,1813.98 r0 top (schematic designator C1036_4)
C1036_4_CH4 "1uF" GEN_C_0402 1808.07,1006.89 r0 top (schematic designator C1036_4)
C1037_4_CH1 "1uF" GEN_C_0402 1882.87,3428.15 r180 top (schematic designator C1037_4)
C1037_4_CH2 "1uF" GEN_C_0402 1882.87,2621.06 r180 top (schematic designator C1037_4)
C1037_4_CH3 "1uF" GEN_C_0402 1882.87,1813.98 r180 top (schematic designator C1037_4)
C1037_4_CH4 "1uF" GEN_C_0402 1882.87,1006.89 r180 top (schematic designator C1037_4)
C1038_4_CH1 "1uF" GEN_C_0402 1808.07,3467.52 r0 top (schematic designator C1038_4)
C1038_4_CH2 "1uF" GEN_C_0402 1808.07,2660.43 r0 top (schematic designator C1038_4)
C1038_4_CH3 "1uF" GEN_C_0402 1808.07,1853.35 r0 top (schematic designator C1038_4)
C1038_4_CH4 "1uF" GEN_C_0402 1808.07,1046.26 r0 top (schematic designator C1038_4)
C1039_4_CH1 "10uF" GEN_C_0603 1829.13,3516.54 r180 top (schematic designator C1039_4)
C1039_4_CH2 "10uF" GEN_C_0603 1829.13,2709.45 r180 top (schematic designator C1039_4)
C1039_4_CH3 "10uF" GEN_C_0603 1829.13,1902.36 r180 top (schematic designator C1039_4)
C1039_4_CH4 "10uF" GEN_C_0603 1829.13,1095.28 r180 top (schematic designator C1039_4)
C1040_4_CH1 "10uF" GEN_C_0603 1950,3467.32 r270 top (schematic designator C1040_4)
C1040_4_CH2 "10uF" GEN_C_0603 1950,2660.24 r270 top (schematic designator C1040_4)
C1040_4_CH3 "10uF" GEN_C_0603 1950,1853.15 r270 top (schematic designator C1040_4)
C1040_4_CH4 "10uF" GEN_C_0603 1950,1046.06 r270 top (schematic designator C1040_4)
C1041_4_CH1 "100nF" GEN_C_0402 1715.55,3251.97 r0 bottom (schematic designator C1041_4)
C1041_4_CH2 "100nF" GEN_C_0402 1715.55,2444.88 r0 bottom (schematic designator C1041_4)
C1041_4_CH3 "100nF" GEN_C_0402 1715.55,1637.8 r0 bottom (schematic designator C1041_4)
C1041_4_CH4 "100nF" GEN_C_0402 1715.55,830.71 r0 bottom (schematic designator C1041_4)
C1042_4_CH1 "100nF" GEN_C_0402 1733.27,3309.06 r270 bottom (schematic designator C1042_4)
C1042_4_CH2 "100nF" GEN_C_0402 1733.27,2501.97 r270 bottom (schematic designator C1042_4)
C1042_4_CH3 "100nF" GEN_C_0402 1733.27,1694.88 r270 bottom (schematic designator C1042_4)
C1042_4_CH4 "100nF" GEN_C_0402 1733.27,887.8 r270 bottom (schematic designator C1042_4)
C1043_4_CH1 "1uF" GEN_C_0402 1933.07,3184.06 r180 top (schematic designator C1043_4)
C1043_4_CH2 "1uF" GEN_C_0402 1933.07,2376.97 r180 top (schematic designator C1043_4)
C1043_4_CH3 "1uF" GEN_C_0402 1933.07,1569.88 r180 top (schematic designator C1043_4)
C1043_4_CH4 "1uF" GEN_C_0402 1933.07,762.8 r180 top (schematic designator C1043_4)
C1044_4_CH1 "1uF" GEN_C_0402 1399.61,3465.55 r0 top (schematic designator C1044_4)
C1044_4_CH2 "1uF" GEN_C_0402 1399.61,2658.46 r0 top (schematic designator C1044_4)
C1044_4_CH3 "1uF" GEN_C_0402 1399.61,1851.38 r0 top (schematic designator C1044_4)
C1044_4_CH4 "1uF" GEN_C_0402 1399.61,1044.29 r0 top (schematic designator C1044_4)
C1045_4_CH1 "1uF" GEN_C_0402 1667.32,2960.63 r270 top (schematic designator C1045_4)
C1045_4_CH2 "1uF" GEN_C_0402 1667.32,2153.54 r270 top (schematic designator C1045_4)
C1045_4_CH3 "1uF" GEN_C_0402 1667.32,1346.46 r270 top (schematic designator C1045_4)
C1045_4_CH4 "1uF" GEN_C_0402 1667.32,539.37 r270 top (schematic designator C1045_4)
C1046_4_CH1 "1uF" GEN_C_0402 1639.76,3465.55 r180 top (schematic designator C1046_4)
C1046_4_CH2 "1uF" GEN_C_0402 1639.76,2658.47 r180 top (schematic designator C1046_4)
C1046_4_CH3 "1uF" GEN_C_0402 1639.76,1851.38 r180 top (schematic designator C1046_4)
C1046_4_CH4 "1uF" GEN_C_0402 1639.76,1044.29 r180 top (schematic designator C1046_4)
C1047_4_CH1 "1uF" GEN_C_0402 1399.61,3426.18 r0 top (schematic designator C1047_4)
C1047_4_CH2 "1uF" GEN_C_0402 1399.61,2619.09 r0 top (schematic designator C1047_4)
C1047_4_CH3 "1uF" GEN_C_0402 1399.61,1812.01 r0 top (schematic designator C1047_4)
C1047_4_CH4 "1uF" GEN_C_0402 1399.61,1004.92 r0 top (schematic designator C1047_4)
C1048_4_CH1 "1uF" GEN_C_0402 1519.49,3483.27 r180 top (schematic designator C1048_4)
C1048_4_CH2 "1uF" GEN_C_0402 1519.49,2676.18 r180 top (schematic designator C1048_4)
C1048_4_CH3 "1uF" GEN_C_0402 1519.49,1869.09 r180 top (schematic designator C1048_4)
C1048_4_CH4 "1uF" GEN_C_0402 1519.49,1062.01 r180 top (schematic designator C1048_4)
C1049_4_CH1 "1uF" GEN_C_0402 1639.76,3426.18 r180 top (schematic designator C1049_4)
C1049_4_CH2 "1uF" GEN_C_0402 1639.76,2619.09 r180 top (schematic designator C1049_4)
C1049_4_CH3 "1uF" GEN_C_0402 1639.76,1812.01 r180 top (schematic designator C1049_4)
C1049_4_CH4 "1uF" GEN_C_0402 1639.76,1004.92 r180 top (schematic designator C1049_4)
C1050_4_CH1 "1uF" GEN_C_0402 1641.73,3017.72 r180 top (schematic designator C1050_4)
C1050_4_CH2 "1uF" GEN_C_0402 1641.73,2210.63 r180 top (schematic designator C1050_4)
C1050_4_CH3 "1uF" GEN_C_0402 1641.73,1403.54 r180 top (schematic designator C1050_4)
C1050_4_CH4 "1uF" GEN_C_0402 1641.73,596.46 r180 top (schematic designator C1050_4)
C1052_4_CH1 "1uF" GEN_C_0402 1475.39,3278.54 r180 top (schematic designator C1052_4)
C1052_4_CH2 "1uF" GEN_C_0402 1475.39,2471.46 r180 top (schematic designator C1052_4)
C1052_4_CH3 "1uF" GEN_C_0402 1475.39,1664.37 r180 top (schematic designator C1052_4)
C1052_4_CH4 "1uF" GEN_C_0402 1475.39,857.28 r180 top (schematic designator C1052_4)
C1053_4_CH1 "1uF" GEN_C_0402 1462.6,2926.18 r90 top (schematic designator C1053_4)
C1053_4_CH2 "1uF" GEN_C_0402 1462.6,2119.09 r90 top (schematic designator C1053_4)
C1053_4_CH3 "1uF" GEN_C_0402 1462.6,1312.01 r90 top (schematic designator C1053_4)
C1053_4_CH4 "1uF" GEN_C_0402 1462.6,504.92 r90 top (schematic designator C1053_4)
C1054_4_CH1 "1uF" GEN_C_0402 1572.83,3356.3 r270 bottom (schematic designator C1054_4)
C1054_4_CH2 "1uF" GEN_C_0402 1572.83,2549.21 r270 bottom (schematic designator C1054_4)
C1054_4_CH3 "1uF" GEN_C_0402 1572.83,1742.13 r270 bottom (schematic designator C1054_4)
C1054_4_CH4 "1uF" GEN_C_0402 1572.83,935.04 r270 bottom (schematic designator C1054_4)
C1055_4_CH1 "1uF" GEN_C_0402 1487.2,3239.17 r180 top (schematic designator C1055_4)
C1055_4_CH2 "1uF" GEN_C_0402 1487.2,2432.09 r180 top (schematic designator C1055_4)
C1055_4_CH3 "1uF" GEN_C_0402 1487.2,1625 r180 top (schematic designator C1055_4)
C1055_4_CH4 "1uF" GEN_C_0402 1487.2,817.91 r180 top (schematic designator C1055_4)
C1056_4_CH1 "1uF" GEN_C_0402 1564.96,3278.54 r0 top (schematic designator C1056_4)
C1056_4_CH2 "1uF" GEN_C_0402 1564.96,2471.46 r0 top (schematic designator C1056_4)
C1056_4_CH3 "1uF" GEN_C_0402 1564.96,1664.37 r0 top (schematic designator C1056_4)
C1056_4_CH4 "1uF" GEN_C_0402 1564.96,857.28 r0 top (schematic designator C1056_4)
C1057_4_CH1 "1uF" GEN_C_0402 1503.94,3199.8 r180 bottom (schematic designator C1057_4)
C1057_4_CH2 "1uF" GEN_C_0402 1503.94,2392.72 r180 bottom (schematic designator C1057_4)
C1057_4_CH3 "1uF" GEN_C_0402 1503.94,1585.63 r180 bottom (schematic designator C1057_4)
C1057_4_CH4 "1uF" GEN_C_0402 1503.94,778.54 r180 bottom (schematic designator C1057_4)
C1058_4_CH1 "18pF" GEN_C_0402 821.17,2920.77 r0 top (schematic designator C1058_4)
C1058_4_CH2 "18pF" GEN_C_0402 821.17,2113.68 r0 top (schematic designator C1058_4)
C1058_4_CH3 "18pF" GEN_C_0402 821.17,1306.59 r0 top (schematic designator C1058_4)
C1058_4_CH4 "18pF" GEN_C_0402 821.17,499.51 r0 top (schematic designator C1058_4)
C1059_4_CH1 "2-6pF" EW_TRIMCAP 1246.06,3391.73 r0 top (schematic designator C1059_4)
C1059_4_CH2 "2-6pF" EW_TRIMCAP 1246.06,2584.65 r0 top (schematic designator C1059_4)
C1059_4_CH3 "2-6pF" EW_TRIMCAP 1246.06,1777.56 r0 top (schematic designator C1059_4)
C1059_4_CH4 "2-6pF" EW_TRIMCAP 1246.06,970.47 r0 top (schematic designator C1059_4)
D1 "RGB" LED_KINGBRIGHT_APFA3010_3X1.5MM_HORIZONTAL 216.49,1702.76 r90 top
D2 "TPD1E1B04" TI_X1SON_DPY0002A 3717.68,2555.41 r90 top
D3 "TPD1E1B04" TI_X1SON_DPY0002A 3715.44,1135.87 r90 bottom
D4 "TPD1E1B04" TI_X1SON_DPY0002A 3681.1,3484.25 r0 bottom
D5 "TPD1E1B04" TI_X1SON_DPY0002A 3807.09,3484.25 r180 bottom
D1000_4_CH1 "1N4148WT-7" GEN_SOD_523 705.51,3326.38 r180 bottom (schematic designator D1000_4)
D1000_4_CH2 "1N4148WT-7" GEN_SOD_523 705.51,2519.29 r180 bottom (schematic designator D1000_4)
D1000_4_CH3 "1N4148WT-7" GEN_SOD_523 705.51,1712.2 r180 bottom (schematic designator D1000_4)
D1000_4_CH4 "1N4148WT-7" GEN_SOD_523 705.51,905.12 r180 bottom (schematic designator D1000_4)
D1001_4_CH1 "1N4148WT-7" GEN_SOD_523 1093.7,3234.65 r180 bottom (schematic designator D1001_4)
D1001_4_CH2 "1N4148WT-7" GEN_SOD_523 1093.7,2427.56 r180 bottom (schematic designator D1001_4)
D1001_4_CH3 "1N4148WT-7" GEN_SOD_523 1093.7,1620.47 r180 bottom (schematic designator D1001_4)
D1001_4_CH4 "1N4148WT-7" GEN_SOD_523 1093.7,813.39 r180 bottom (schematic designator D1001_4)
EMI1 "2286211-3" TE_2286211-3 2202.76,1018.7 r315 top
EMI2 "2286211-3" TE_2286211-3 3585.63,2385.83 r315 top
FB1 "120@100MHZ" GEN_R_0402 2451.77,2123.03 r90 bottom
FB2 "120@100MHZ" GEN_R_0402 2451.77,2232.28 r270 bottom
FB3 "120@100MHZ" GEN_R_0402 3037.4,2126.97 r90 bottom
FB11 "120@100MHZ" GEN_R_0402 3005.17,1280.57 r0 bottom
FB12 "120@100MHZ" GEN_R_0402 2942.97,1339.43 r180 bottom
FB13 "120@100MHZ" GEN_R_0402 2916.39,1183.92 r180 bottom
FB1000_4_CH1 "120@100MHZ" GEN_R_0402 1883.86,3468.11 r180 top (schematic designator FB1000_4)
FB1000_4_CH2 "120@100MHZ" GEN_R_0402 1883.86,2661.02 r180 top (schematic designator FB1000_4)
FB1000_4_CH3 "120@100MHZ" GEN_R_0402 1883.86,1853.94 r180 top (schematic designator FB1000_4)
FB1000_4_CH4 "120@100MHZ" GEN_R_0402 1883.86,1046.85 r180 top (schematic designator FB1000_4)
FB1001_4_CH1 "120@100MHZ" GEN_R_0402 1694.88,3310.04 r270 bottom (schematic designator FB1001_4)
FB1001_4_CH2 "120@100MHZ" GEN_R_0402 1694.88,2502.95 r270 bottom (schematic designator FB1001_4)
FB1001_4_CH3 "120@100MHZ" GEN_R_0402 1694.88,1695.87 r270 bottom (schematic designator FB1001_4)
FB1001_4_CH4 "120@100MHZ" GEN_R_0402 1694.88,888.78 r270 bottom (schematic designator FB1001_4)
FID1 "PCB" GEN_FID 2381.89,866.14 r90 top
FID2 "PCB" GEN_FID 3404.53,2542.32 r90 top
J1 "BNC" DOSIN-801-0072 3897.64,2570.87 r270 top
J2 "BNC" DOSIN-801-0072 3897.64,1149.61 r270 top
J3 "1.27mm 6 Pin TH" GEN_1.27MM_2X5_PIN_TH_RA 3744.09,3576.77 r0 top
J3_4_CH1 "UFL" TE_2334884-1 1994.09,3246.06 r180 bottom (schematic designator J3_4)
J3_4_CH2 "UFL" TE_2334884-1 1994.09,2438.98 r180 bottom (schematic designator J3_4)
J3_4_CH3 "UFL" TE_2334884-1 1994.09,1631.89 r180 bottom (schematic designator J3_4)
J3_4_CH4 "UFL" TE_2334884-1 1994.09,824.8 r180 bottom (schematic designator J3_4)
J4 "TSW-101-16-G-Q-RA" GEN_5.08MM_1X2_PIN_TH_RA 376.55,3549.21 r0 top
J4_4_CH1 "UFL" TE_2334884-1 1993.33,3362.85 r0 bottom (schematic designator J4_4)
J4_4_CH2 "UFL" TE_2334884-1 1993.33,2555.76 r0 bottom (schematic designator J4_4)
J4_4_CH3 "UFL" TE_2334884-1 1993.33,1748.67 r0 bottom (schematic designator J4_4)
J4_4_CH4 "UFL" TE_2334884-1 1993.33,941.59 r0 bottom (schematic designator J4_4)
J5 "2.54mm 6 Pin TH" GEN_1.27MM_6_PIN_TH_RA 4035.43,745.08 r270 bottom
J8 "M.2 Key M" TE_M2_KEYM_2199230 3543.31,365.16 r180 bottom locked
J9 "F300-1B7H1-11036-E100" AMPHENOL_F300-1B7H1-11036-E100 3984.25,1860.24 r90 top
J10 "HC-1.25-2PLT" CONN-SMD_HC-1.25-2PLT 3742,682.9 r180 top
J1002_4_CH1 "BNC" DOSIN-801-0072 346.46,2981.3 r90 top (schematic designator J1002_4)
J1002_4_CH2 "BNC" DOSIN-801-0072 346.46,2128.94 r90 top (schematic designator J1002_4)
J1002_4_CH3 "BNC" DOSIN-801-0072 346.46,1276.57 r90 top (schematic designator J1002_4)
J1002_4_CH4 "BNC" DOSIN-801-0072 346.46,424.21 r90 top (schematic designator J1002_4)
K1000_4_CH1 "UD2-4.5NUN-L" KEMET_UD2-4.5NU 763.78,3176.93 r270 top (schematic designator K1000_4)
K1000_4_CH2 "UD2-4.5NUN-L" KEMET_UD2-4.5NU 763.78,2369.84 r270 top (schematic designator K1000_4)
K1000_4_CH3 "UD2-4.5NUN-L" KEMET_UD2-4.5NU 763.78,1562.76 r270 top (schematic designator K1000_4)
K1000_4_CH4 "UD2-4.5NUN-L" KEMET_UD2-4.5NU 763.78,755.67 r270 top (schematic designator K1000_4)
K1001_4_CH1 "UD2-4.5NUN-L" KEMET_UD2-4.5NU 1110.24,3061.02 r270 top (schematic designator K1001_4)
K1001_4_CH2 "UD2-4.5NUN-L" KEMET_UD2-4.5NU 1110.24,2253.94 r270 top (schematic designator K1001_4)
K1001_4_CH3 "UD2-4.5NUN-L" KEMET_UD2-4.5NU 1110.24,1446.85 r270 top (schematic designator K1001_4)
K1001_4_CH4 "UD2-4.5NUN-L" KEMET_UD2-4.5NU 1110.24,639.76 r270 top (schematic designator K1001_4)
L1 "1uH" GEN_L_1210 3816.34,3075.2 r0 top
L2 "1uH" GEN_L_1210 3560.04,1128.94 r270 top
L3 "1uH" GEN_L_1210 2374.02,1395.67 r270 top
L4 "1uH" GEN_L_1210 2227.36,1706.69 r90 top
L5 "1uH" GEN_L_1210 3404.53,1443.36 r90 top
L6 "2.2uH" GEN_L_1210 2110,547 r270 bottom
P1 "PCIeX4-GF-2D-1000-1K-O64" PCIEX4-GF-2D-1000-1K-O64 2171.26,-39.37 r0 top
Q1 "DMN62D0UW" GEN_SOT_323 2437.99,3402.56 r90 bottom
Q2 "DMN62D0UW" GEN_SOT_323 2437.99,3294.29 r90 bottom
Q3 "DMN62D0UW" GEN_SOT_323 2281.5,263.78 r180 bottom
Q1002_4_CH1 "DMN62D0UW" GEN_SOT_323 838.58,3292.32 r0 bottom (schematic designator Q1002_4)
Q1002_4_CH2 "DMN62D0UW" GEN_SOT_323 838.58,2485.24 r0 bottom (schematic designator Q1002_4)
Q1002_4_CH3 "DMN62D0UW" GEN_SOT_323 838.58,1678.15 r0 bottom (schematic designator Q1002_4)
Q1002_4_CH4 "DMN62D0UW" GEN_SOT_323 838.58,871.06 r0 bottom (schematic designator Q1002_4)
Q1003_4_CH1 "DMN62D0UW" GEN_SOT_323 1193.9,3196.85 r0 bottom (schematic designator Q1003_4)
Q1003_4_CH2 "DMN62D0UW" GEN_SOT_323 1193.9,2389.76 r0 bottom (schematic designator Q1003_4)
Q1003_4_CH3 "DMN62D0UW" GEN_SOT_323 1193.9,1582.68 r0 bottom (schematic designator Q1003_4)
Q1003_4_CH4 "DMN62D0UW" GEN_SOT_323 1193.9,775.59 r0 bottom (schematic designator Q1003_4)
R1 "10K" GEN_R_0402 3546.26,1315.4 r0 bottom
R2 "0" GEN_R_0402 3490.16,700.79 r180 bottom
R3 "0" GEN_R_0402 3490.16,661.42 r180 bottom
R4 "0" GEN_R_0402 3455.71,2062.01 r180 top
R5 "0" GEN_R_0402 3455.71,2024.61 r180 top
R6 "2K" GEN_R_0402 318.9,1720.47 r0 top
R7 "100" GEN_R_0402 344.49,3460.63 r0 bottom
R8 "10K" GEN_R_0402 419.29,3368.11 r90 bottom
R9 "4.7K" GEN_R_0402 2517.72,3394.69 r270 bottom
R10 "4.7K" GEN_R_0402 2517.72,3288.39 r270 bottom
R11 "4.7K" GEN_R_0402 2358.27,3384.84 r90 bottom
R12 "4.7K" GEN_R_0402 2358.27,3312.01 r270 bottom
R13 "10K" GEN_R_2ARRAY_0606 2679.92,3204.13 r270 top
R14 "0.01" GEN_R_0603 3696.26,3004.53 r90 top
R15 "10K" GEN_R_0402 2285.43,2273.62 r90 bottom
R16 "10K" GEN_R_0402 2424.21,2322.83 r90 bottom
R17 "10K" GEN_R_0402 2540.35,2204.74 r180 bottom